# Altium PCB MergenSMPSBoardDesign.PcbDoc (part 2 of 3)
Units mm, origin at the board's own origin, x right, y up, seen from the top; angles counter-clockwise.
Board outline 115 x 90 mm, 4 copper layers (Top Layer, Layer 2, Layer 3, Bottom Layer), stack 1.527 mm thick; 83 components, 46 nets, 675 pads, 1118 vias.
Unrouted connection lines stored in the file: 1.
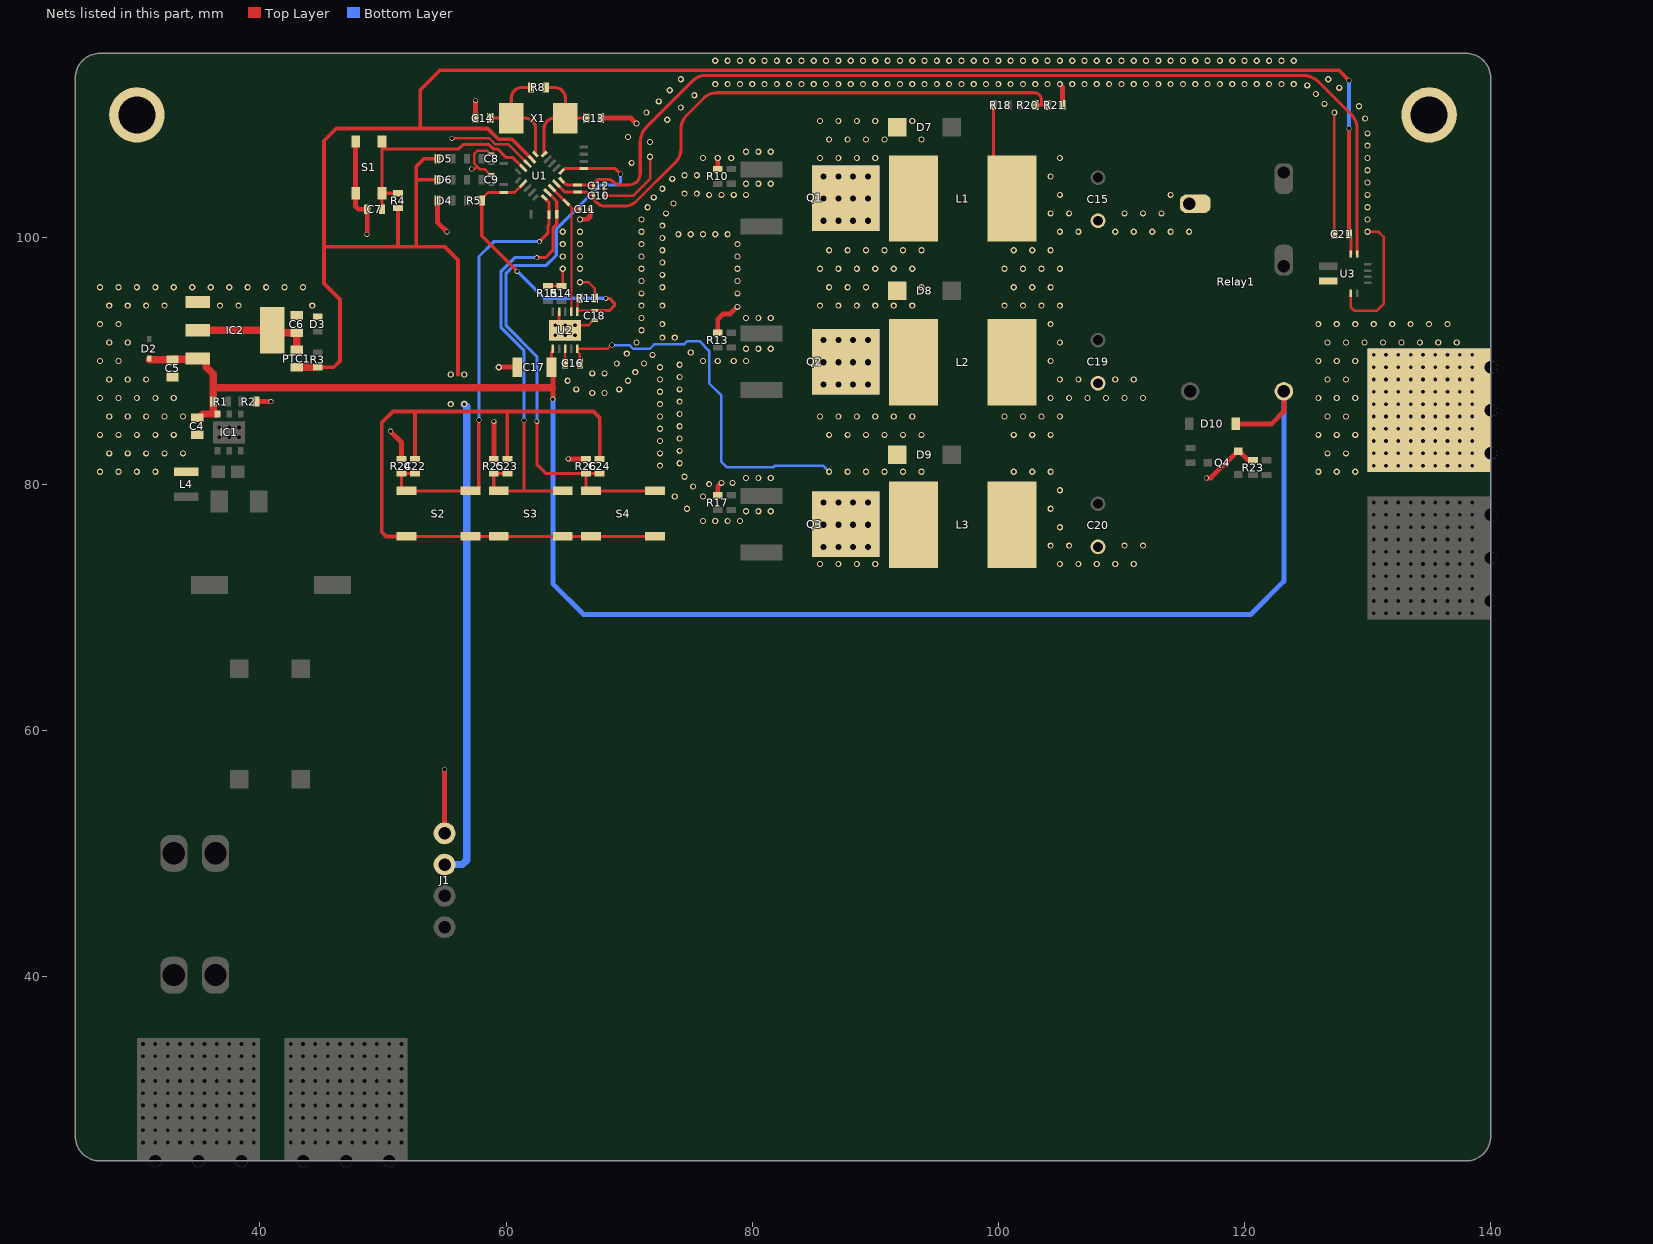
[diagram p4: the nets of this part, all layers, seen from the top]

## Part data
C1: library part MergenElektronik_Capacitors_AluminumElectrolytics_SMDs_UUX1J101MNL1GS, "Mergen Elektronik - Capacitors - Aluminum Electrolytics - SMDs - UUX1J101MNL1GS", Manufacturer=Nichicon, Manufacturer Number=UUX1J101MNL1GS, Package=10x10.5mm, Supplier Part Number 1=493-7453-1-ND, Temperature="-55°C up to +105°C", Tolerance=±20%, Voltage Rated=63V, Digi-Key Number=493-7453-1-ND, Farnell Number=2841944, Model="Aluminum Electrolytic Capacitors", Mounting Type="Surface Mount", Mouser Number=647-UUX1J101MNL1GS, Supplier 1=Digikey, Supplier 2=Mouser, Supplier Part Number 2=647-UUX1J101MNL1GS
C2: library part MergenElektronik_Capacitors_Ceramic_SMDs_0.33µF_100V, "Mergen Elektronik - Capacitors - Ceramics - SMDs - 1206 - 0.33 µF - 100V", Manufacturer="TDK Corporation", Manufacturer Number=C3216X7R2A334K130AA, Package="1206(3216 Metric)", Supplier Part Number 1=445-4464-6-ND, Temperature="-55°C up to +125°C", Tolerance=±10%, Voltage Rated=100V, Digi-Key Number=445-4464-1-ND, Farnell Number=2525186, Model="Ceramic Capacitors", Mounting Type="Surface Mount", Mouser Number=810-C3216X7R2A334K, Supplier 1=Digikey, Supplier 2=Mouser, Supplier Part Number 2=810-C3216X7R2A334K
C3: library part MergenElektronik_Capacitors_Ceramic_SMDs_10nF_100V, "Mergen Elektronik - Capacitors - Ceramics - SMDs - 0603 - 10 nF - 100V", Manufacturer="Murata Electronics", Manufacturer Number=GCM188R72A103KA37D, Package="0603(1608 Metric)", Supplier Part Number 1=490-4781-1-ND, Temperature="-55°C up to +125°C", Tolerance=±10%, Voltage Rated=100V, Digi-Key Number=490-4781-1-ND, Farnell Number=2470432, Model="Ceramic Capacitors", Mounting Type="Surface Mount", Mouser Number=81-GCM188R72A103KA7D, Supplier 1=Digikey, Supplier 2=Mouser, Supplier Part Number 2=81-GCM188R72A103KA7D, Özdisan Number=GCM188R72A103KA37D
C4 C5 C6 C7 C21 C22 C23 C24: library part MergenElektronik_Capacitors_Ceramic_SMDs_100nF_16V, "Mergen Elektronik - Capacitors - Ceramics - SMDs - 0603 - 100 nF - 16V", Manufacturer="Samsung Electro-Mechanics", Manufacturer Number=CL10B104KO8NNNC, Package=0603(1608), Supplier Part Number 1=187-CL10B104KO8NNNC, Temperature="-55°C up to +125°C", Tolerance=±10%, Voltage Rated=16V, Digi-Key Number=1276-1005-1-ND, Farnell Number=3013413, Model="Ceramic Capacitors", Mounting Type="Surface Mount", Mouser Number=187-CL10B104KO8NNNC, Supplier 1=Mouser, Supplier 2=Digi-Key, Supplier Part Number 2=1276-1005-6-ND, Özdisan Number=CL10B104KO8NNNC
C8 C9 C10 C11 C12: library part MergenElektronik_Capacitors_Ceramic_SMDs_50pF_50V, "Mergen Elektronik - Capacitors - Ceramics - SMDs - 0402 - 50 pF - 50V", Manufacturer=YAGEO, Manufacturer Number=CC0402JRNPO9BN500, Package=0603(1608), Supplier Part Number 1=13-CC0402JRNPO9BN500TR-ND, Temperature="-55°C up to +125°C", Tolerance=±5%, Voltage Rated=50V, Digi-Key Number=13-CC0402JRNPO9BN500TR-ND, Model="Ceramic Capacitors", Mounting Type="Surface Mount", Mouser Number=603-CC0402JNPO9BN500, Supplier 1=Digi-Key, Supplier 2=Mouser, Supplier Part Number 2=603-CC0402JNPO9BN500, Özdisan Number=CC0402JRNPO9BN500
C13 C14: library part MergenElektronik_Capacitors_Ceramic_SMDs_8pF_50V, "Mergen Elektronik - Capacitors - Ceramics - SMDs - 0603 - 8 pF - 50V", Manufacturer=YAGEO, Manufacturer Number=CC0603DRNPO9BN8R0, Package=0603(1608), Supplier Part Number 1=311-1057-6-ND, Temperature="-55°C up to +125°C", Tolerance=±0.5pF, Voltage Rated=50V, Digi-Key Number=311-1057-1-ND, Farnell Number=3764404RL, Model="Ceramic Capacitors", Mounting Type="Surface Mount", Mouser Number=603-CC603DRNPO9BN8R0, Supplier 1=Digikey, Supplier 2=Mouser, Supplier Part Number 2=603-CC603DRNPO9BN8R0, Özdisan Number=CC0603DRNPO9BN8R0
C15 C19 C20: library part MergenElektronik_Capacitors_AluminumElectrolytics_THTs_63SXE18M, "Mergen Elektronik- Capacitors - Aluminum Electrolytics - THTs - 63SXE18M", Manufacturer="Panasonic Electronic Components", Manufacturer Number=100SXE6R8M, Package=8x7mm, Supplier Part Number 1=P122614-ND, Temperature="-55°C up to +125°C", Tolerance=±20%, Voltage Rated=63V, Digi-Key Number=P122614-ND, Farnell Number=2920530, Model="Aluminum Electrolytic Capacitors", Mounting Type="Through Hole", Mouser Number=667-63SXE18M, Supplier 1=Digikey, Supplier 2=Mouser, Supplier Part Number 2=667-63SXE18M, Özdisan Number=63SXE18M
C16: library part MergenElektronik_Capacitors_Ceramic_SMDs_100nF_100V, "Mergen Elektronik - Capacitors - Ceramics - SMDs - 0603 - 100 nF - 100V", Manufacturer="Samsung Electro-Mechanics", Manufacturer Number=CL10B104KC8NNNC, Package="0603(1608 Metric)", Supplier Part Number 1=1276-6807-1-ND, Temperature="-55°C up to +125°C", Tolerance=±10%, Voltage Rated=100V, Digi-Key Number=1276-6807-1-ND, Farnell Number=3013412, Model="Ceramic Capacitors", Mounting Type="Surface Mount", Mouser Number=187-CL10B104KC8NNNC, Supplier 1=Digikey, Supplier 2=Mouser, Supplier Part Number 2=187-CL10B104KC8NNNC, Özdisan Number=CL10B104KC8NNNC
C17: library part MergenElektronik_Capacitors_Ceramic_SMDs_1µF_100V, "Mergen Elektronik - Capacitors - Ceramics - SMDs - 1206 - 1 µF - 100V", Manufacturer="Samsung Electro-Mechanics", Manufacturer Number=CL31B105KCHNNNE, Package="1206(3216 Metric)", Supplier Part Number 1=1276-1838-1-ND, Temperature="-55°C up to +125°C", Tolerance=±10%, Voltage Rated=100V, Digi-Key Number=1276-1838-1-ND, Model="Ceramic Capacitors", Mounting Type="Surface Mount", Mouser Number=187-CL31B105KCHNNNE, Supplier 1=Digikey, Supplier 2=Mouser, Supplier Part Number 2=187-CL31B105KCHNNNE, Özdisan Number=CL31B105KCHNNNE
C18: library part MergenElektronik_Capacitors_Ceramic_SMDs_1nF_50V, "Mergen Elektronik - Capacitors - Ceramics - SMDs - 0402 - 1 nF - 50V", Manufacturer="Murata Electronics", Manufacturer Number=GRM1555C1H102JA01D, Package="0402(1005 Metric)", Supplier Part Number 1=490-3244-1-ND, Temperature="-55°C up to +125°C", Tolerance=±5%, Voltage Rated=50V, Digi-Key Number=490-3244-1-ND, Farnell Number=8819556, Model="Ceramic Capacitors", Mounting Type="Surface Mount", Mouser Number=81-GRM1555C1H102JA1D, Supplier 1=Digikey, Supplier 2=Mouser, Supplier Part Number 2=81-GRM1555C1H102JA1D, Özdisan Number=GRM1555C1H102JA01D
D1: library part MergenElektronik_Diodes_BridgeRectifiers_TBS606, "Mergen Elektronik - Diodes - Bridge Rectifiers - TBS606", Current Rating=6A, Manufacturer="Taiwan Semiconductor Corporation", Supplier Part Number 1=1801-TBS606CT-ND, Temperature="-55°C up to 150°C (TJ)", Voltage Rated=600V, Digi-Key Number=1801-TBS606TR-ND, Manufacturer Number=TBS606, Model="Bridge Rectifier", Mounting Type="Surface Mount", Mouser Number=821-TBS606, Package=TBS606, Supplier 1=Digikey, Supplier 2=Mouser, Supplier Part Number 2=821-TBS606
D2: library part MergenElektronik_Diodes_SchottkyDiodes_BAT54XV2T1G, "Mergen Elektronik - Diodes - Schottky Diodes - BAT54XV2T1G", Current Rating=200mA, Manufacturer=onsemi, Package=SOD-523, Supplier Part Number 1=BAT54XV2T1GOSCT-ND, Temperature="-55°C up to +150°C", Voltage Rated=100V, Digi-Key Number=BAT54XV2T1GOSCT-ND, Farnell Number=1459034, Manufacturer Number=BAT54XV2T1G, Model="Schottky Diodes", Mounting Type="Surface Mount", Mouser Number=863-BAT54XV2T1G, Supplier 1=Digikey, Supplier 2=Mouser, Supplier Part Number 2=863-SBAT54XV2T1G
D3 D4: library part MergenElektronik_LEDs_SMDs_Red_0603, "Mergen Elektronik - Leds - SMDs - Red - 0603", Manufacturer="Würth Elektronik", Manufacturer Number=150060RS75000, Package=0603(1608), Supplier Part Number 1=732-4978-1-ND, Temperature="-45°C up to +85°C", Voltage Rated=2V, Color=Red, Digi-Key Number=732-4978-1-ND, Farnell Number=2322071, Model="SMD Leds", Mounting Type="Surface Mount", Mouser Number=710-150060RS75000, Supplier 1=Digi-Key, Supplier 2=Mouser, Supplier Part Number 2=710-150060RS75000, Özdisan Number=150060RS75000
D5 D6: library part MergenElektronik_LEDs_SMDs_Green_0603, "Mergen Elektronik - Leds - SMDs - Green - 0603", Manufacturer="Würth Elektronik", Manufacturer Number=150060GS75000, Package=0603(1608), Supplier Part Number 1=732-4971-6-ND, Temperature="-45°C up to +85°C", Voltage Rated=3.2V, Color=Green, Digi-Key Number=732-4971-1-ND, Farnell Number=2322070, Model="SMD Leds", Mounting Type="Surface Mount", Mouser Number=710-150060GS75000, Supplier 1=Digi-Key, Supplier 2=Mouser, Supplier Part Number 2=710-150060GS75000, Özdisan Number=150060GS75000
D7 D8 D9: library part MergenElektronik_Diodes_SchottkyDiodes_SL310A-TP, "Mergen Elektronik - Diodes - Schottky Diodes - SL310A-TP", Current Rating=3A, Manufacturer="Micro Commercial Co", Package=DO-214AC(SMA), Supplier Part Number 1=SL310A-TPMSDKR-ND, Temperature="-55°C up to +150°C", Voltage Rated=100V, Digi-Key Number=SL310A-TPMSTR-ND, Manufacturer Number=SL310A-TP, Model="Schottky Diodes", Mounting Type="Surface Mount", Mouser Number=833-SL310A-TP, Supplier 1=Digikey, Supplier 2=Mouser, Supplier Part Number 2=833-SL310A-TP
D10: library part MergenElektronik_Diodes_SingleDiodes_1N4007FL, "Mergen Elektronik - Diodes - Single Diodes - 1N4007FL", Current Rating=1A, Manufacturer="SMC Diode Solutions", Package=SOD-123F, Supplier Part Number 1=1655-1N4007FLCT-ND, Temperature="-65°C up to +150°C", Voltage Rated=1000V, Digi-Key Number=1655-1N4007FLCT-ND, Manufacturer Number=1N4007FL, Model="Single Diodes", Mounting Type="Surface Mount", Supplier 1=Digi-Key
F1: library part MergenElektronik_FuseHolders_BladeType_3568, "Mergen Elektronik - Fuse Holder - Blade Type - 3568", Current Rating=30A, Manufacturer="Keystone Electronics", Supplier Part Number 1=36-3568-ND, Temperature="-50°C up to+145°C", Voltage Rated=500V, Digi-Key Number=36-3568-ND, Farnell Number=2504685, Manufacturer Number=3568, Model="Blade Type", Mounting Type=THT, Mouser Number=534-3568, Package=3568, Supplier 1=Digi-Key, Supplier 2=Mouser, Supplier Part Number 2=534-3568
IC1: library part MergenElektronik_Regulators_Linears_MAX5084ATT+T, "Mergen Elektronik - Regulators - Linears - MAX5084ATT+T", Current Rating=200mA, Manufacturer="Analog Devices Inc./Maxim Integrated", Output Voltage="2.54V up to 11V", Package=6-TDFN, Supplier Part Number 1=MAX5084ATT+CT-ND, Temperature="-40°C up to +125°C", Voltage Rated="4V up to 65V", Digi-Key Number=MAX5084ATT+TR-ND, Farnell Number=2514348, Manufacturer Number=MAX5084ATT+T, Model=Linear, Mounting Type="Surface Mount", Mouser Number=700-MAX5084ATTT, Supplier 1=Digikey, Supplier 2=Mouser, Supplier Part Number 2=700-MAX5084ATTT
IC2: library part MergenElektronik_Regulators_Linears_NCP1117ST33T3G, "Mergen Elektronik - Regulators - Linears - NCP1117ST33T3G", Current Rating=1A, Manufacturer=onsemi, Manufacturer Number=NCP1117ST33T3G, Output Voltage=3.3V, Package=SOT-223, Supplier Part Number 1=NCP1117ST33T3GOSCT-ND, Temperature="0°C up to +125°C", Voltage Rated="4.75VDC up to 10V", Digi-Key Number=NCP1117ST33T3GOSCT-ND, Model=Linear, Mounting Type="Surface Mount", Mouser Number=863-NCP1117ST33T3G, Supplier 1=Digi-Key, Supplier 2=Mouser, Supplier Part Number 2=863-NCP1117ST33T3G, Özdisan Number=NCP1117ST33T3G
J1: library part MergenElektronik_Connectors_Headers_1x4_Male, "Mergen Elektronik - Connectors - Headers - 1x4 Male"
L1 L2 L3: library part MergenElektronik_Inductors_PowerInductors_SMDs_ASPI-8040S-750M-T, "Mergen Elektronik - Inductors - Power Inductors - SMDs - 8x8mm  75-µh - 1.2A", Current Rating=1.2A, Manufacturer="Abracon LLC", Manufacturer Number=ASPI-8040S-750M-T, Package="8x8x4mm Shielded", Supplier Part Number 1=535-13053-1-ND, Temperature="-40°C up to  125°C", Digi-Key Number=535-13053-1-ND, Model="Power Inductor", Mounting Type="Surface Mount", Mouser Number=815-ASPI-8040S-750MT, Supplier 1=Digikey, Supplier 2=Mouser, Supplier Part Number 2=815-ASPI-8040S-750MT
L4: library part MergenElektronik_Inductors_PowerInductors_SMDs_1008_2.2µH-2A, "Mergen Elektronik - Inductors - Power Inductors - SMDs - 1008 - 2.2 µh - 2A", Current Rating=2A, Manufacturer="Samsung Electro-Mechanics", Manufacturer Number=CIGT252008LM2R2MNE, Package="1008 (2520 Metric)", Supplier Part Number 1=1276-6925-6-ND, Temperature="-40°C up to  125°C", Digi-Key Number=1276-6925-1-ND, Model="Power Inductor", Mounting Type="Surface Mount", Mouser Number=187-CIGT252008LM2R2M, Supplier 1=Digi-Key, Supplier 2=Mouser, Supplier Part Number 2=187-CIGT252008LM2R2M
PTC1: library part MergenElektronik_CircuitProtections_PTCs_0ZCK0020FF2G, "Mergen Elektronik - Circuit Protections - PTCs - 0ZCK0020FF2G", Current - Hold="200 mA", Current - Max=100A, Current - Trip="500 mA", Manufacturer="Bel Fuse Inc.", Package=0805(2012), Supplier Part Number 1=507-1811-6-ND, Temperature="-40°C up to 85°C", Voltage Rated=9V, Current Rating="500 mA", Digi-Key Number=507-1811-1-ND, Manufacturer Number=0ZCK0020FF2G, Model="PTC Fuse", Mounting Type="Surface Mount", Mouser Number=530-0ZCK0020FF2G, Supplier 1=Digi-Key, Supplier 2=Mouser, Supplier Part Number 2=530-0ZCK0020FF2G
Q1 Q2 Q3: library part MergenElektronik_Transistors_Mosfets_DMN10H220LK3-13, "Mergen Elektronik - Transistors - Mosfets - DMN10H220LK3-13", Current Rating=7.5A, Manufacturer="Diodes Incorporated", Package="TO-252-3 DPAK", Supplier Part Number 1=31-DMN10H220LK3-13CT-ND, Temperature="-55°C up to +175°C (TJ)", Voltage Rated=100V, Digi-Key Number=31-DMN10H220LK3-13CT-ND, Farnell Number=3943521RL, Manufacturer Number=DMN10H220LK3-13, Model=Mosfet, Mounting Type="Surface Mount", Mouser Number=621-DMN10H220LK3-13, Rating Current=7.5A, Supplier 1=Digikey, Supplier 2=Mouser, Supplier Part Number 2=621-DMN10H220LK3-13, Vdss=100V, Id=7.5A
Q4: library part MergenElektronik_Transistors_Mosfets_BSS138LT1G, "Mergen Elektronik - Transistors - Mosfets - BSS138LT1G", Current Rating=200mA, Manufacturer=onsemi, Package=SOT-23, Supplier Part Number 1=BSS138LT1GOSCT-ND, Temperature="-55°C up to +175°C (TJ)", Voltage Rated=50V, Digi-Key Number=BSS138LT1GOSCT-ND, Farnell Number=1431319, Manufacturer Number=BSS138LT1G, Model=Mosfet, Mounting Type="Surface Mount", Mouser Number=863-BSS138LT1G, Rating Current=200mA, Supplier 1=Digi-Key, Supplier 2=Mouser, Supplier Part Number 2=863-BSS138LT1G, Vdss=50V, Özdisan Number=BSS138LT1G, Id=200mA
R1 R11 R14 R15 R23 R24 R25 R26: library part MergenElektronik_Resistors_ChipResistors_0603_10K, "Mergen Elektronik - Resistors - Chip Resistors - 0603 - 10K", Manufacturer="Stackpole Electronics Inc", Manufacturer Number=RMCF0603JT10K0, Package=0603(1608), Power=1/10W, Supplier Part Number 1=RMCF0603JT10K0-ND, Temperature="-55°C up to +155°C - X8R", Tolerance=±5%, Digi-Key Number=RMCF0603JT10K0CT-ND, Model="Chip Resistor", Mounting Type="Surface Mount", Supplier 1=Digi-Key
R2: library part MergenElektronik_Resistors_ChipResistors_0603_2K, "Mergen Elektronik - Resistors - Chip Resistors - 0603 - 2K", Manufacturer="Panasonic Electronic Components", Manufacturer Number=ERJ-3EKF2001V, Package=0603(1608), Power=1/10W, Supplier Part Number 1=P2.00KHDKR-ND, Temperature="-55°C up to +155°C - X8R", Tolerance=±1%, Digi-Key Number=P2.00KHCT-ND, Farnell Number=2059343, Model="Chip Resistor", Mounting Type="Surface Mount", Mouser Number=667-ERJ-3EKF2001V, Supplier 1=Digikey, Supplier 2=Mouser, Supplier Part Number 2=667-ERJ-3EKF2001V, Özdisan Number=ERJ-3EKF2001V
R3 R5 R6 R7 R9 R12 R16 R22: library part MergenElektronik_Resistors_ChipResistors_0603_330R, "Mergen Elektronik - Resistors - Chip Resistors - 0603 - 330R", Manufacturer="Stackpole Electronics Inc", Manufacturer Number=RMCF0603JT330R, Package=0603(1608), Power=1/10W, Supplier Part Number 1=RMCF0603JT330RCT-ND, Temperature="-55°C up to +155°C - X8R", Tolerance=±5%, Digi-Key Number=RMCF0603JT330RCT-ND, Model="Chip Resistor", Mounting Type="Surface Mount", Supplier 1=Digi-Key
R4 R18: library part MergenElektronik_Resistors_ChipResistors_0603_40K, "Mergen Elektronik - Resistors - Chip Resistors - 0603 - 40K", Manufacturer=YAGEO, Manufacturer Number=RT0603BRD0740KL, Package=0603(1608), Power=1/10W, Supplier Part Number 1=13-RT0603BRD0740KLDKR-ND, Temperature="-55°C up to +155°C - X8R", Tolerance=±0.1%, Digi-Key Number=13-RT0603BRD0740KLTR-ND, Model="Chip Resistor", Mounting Type="Surface Mount", Mouser Number=603-RT0603BRD0740KL, Supplier 1=Digikey, Supplier 2=Mouser, Supplier Part Number 2=603-RT0603BRD0740KL
R8: library part MergenElektronik_Resistors_ChipResistors_0603_200K, "Mergen Elektronik - Resistors - Chip Resistors - 0603 - 200K", Manufacturer="Stackpole Electronics Inc", Manufacturer Number=RMCF0603FT200K, Package=0603(1608), Power=1/10W, Supplier Part Number 1=RMCF0603FT200KTR-ND, Temperature="-55°C up to +155°C - X8R", Tolerance=±1%, Digi-Key Number=RMCF0603FT200KTR-ND, Model="Chip Resistor", Mounting Type="Surface Mount", Mouser Number=708-RMCF0603FT200K, Supplier 1=Digikey, Supplier 2=Mouser, Supplier Part Number 2=708-RMCF0603FT200K
R10 R13 R17: library part MergenElektronik_Resistors_ChipResistors_0603_1K, "Mergen Elektronik - Resistors - Chip Resistors - 0603 - 1K", Manufacturer="Stackpole Electronics Inc", Manufacturer Number=RMCF0603JT1K00, Package=0603(1608), Power=1/10W, Supplier Part Number 1=RMCF0603JT1K00DKR-ND, Temperature="-55°C up to +155°C - X8R", Tolerance=±5%, Digi-Key Number=RMCF0603JT1K00CT-ND, Model="Chip Resistor", Mounting Type="Surface Mount", Mouser Number=708-RMCF0603JT1K00, Supplier 1=Digikey, Supplier 2=Mouser, Supplier Part Number 2=708-RMCF0603JT1K00
R19: library part MergenElektronik_Resistors_ChipResistors_0603_22, "Mergen Elektronik - Resistors - Chip Resistors - 0603 - 22", Manufacturer="TE Connectivity Passive Product", Manufacturer Number=CRGCQ0603J22R, Package=0603(1608), Power=1/10W, Supplier Part Number 1=A130081CT-ND, Temperature="-55°C up to +155°C - X8R", Tolerance=±5%, Digi-Key Number=A130081CT-ND, Farnell Number=2861854, Model="Chip Resistor", Mounting Type="Surface Mount", Mouser Number=279-CRGCQ0603J22R, Supplier 1=Digi-Key, Supplier 2=Mouser, Supplier Part Number 2=279-CRGCQ0603J22R, Özdisan Number=RMCF0603ZT0R00
R20: library part MergenElektronik_Resistors_ChipResistors_0603_6.65K, "Mergen Elektronik - Resistors - Chip Resistors - 0603 - 6.65K", Manufacturer=YAGEO, Manufacturer Number=RC0603FR-076K65L, Package=0603(1608), Power=1/10W, Supplier Part Number 1=311-6.65KHRCT-ND, Temperature="-55°C up to +155°C - X8R", Tolerance=±1%, Digi-Key Number=311-6.65KHRCT-ND, Farnell Number=3950957, Model="Chip Resistor", Mounting Type="Surface Mount", Mouser Number=603-RC0603FR-076K65L, Supplier 1=Digikey, Supplier 2=Mouser, Supplier Part Number 2=603-RC0603FR-076K65L, Özdisan Number=RC0603FR-076K65L
R21: library part MergenElektronik_Resistors_ChipResistors_0603_3.3K, "Mergen Elektronik - Resistors - Chip Resistors - 0603 - 3.3K", Manufacturer=YAGEO, Manufacturer Number=RC0603FR-073K3L, Package=0603(1608), Power=1/10W, Supplier Part Number 1=311-3.30KHRCT-ND, Temperature="-55°C up to +155°C - X8R", Tolerance=±1%, Digi-Key Number=311-3.30KHRTR-ND, Farnell Number=9238549, Model="Chip Resistor", Mounting Type="Surface Mount", Mouser Number=603-RC0603FR-073K3L, Supplier 1=Digikey, Supplier 2=Mouser, Supplier Part Number 2=RC0603FR-073K3L, Özdisan Number=RC0603FR-073K3L
Relay1: library part MergenElektronik_Relays_PowerRelays_ALQ105, "Mergen Elektronik - Relays - Power Relays - ALQ105", Current Rating=5A, Manufacturer="Panasonic Electric Works", Supplier Part Number 1=255-3565-ND, Switching Voltage="250VAC, 30VDC - Max", Temperature="-40°C up to 85°C", Digi-Key Number=255-3565-ND, Farnell Number=2503675, Manufacturer Number=ALQ105, Model="Power Relays", Mounting Type=THT, Mouser Number=769-ALQ105, Package=ALQ105, Supplier 1=Digi-Key, Supplier 2=Mouser, Supplier Part Number 2=769-ALQ105
S1: library part MergenElektronik_Switches_TactileSwitches_PTS815-SJM, "Mergen Elektronik - Switches - Tactile  Switches", Current Rating=50mA, Manufacturer=C&K, Manufacturer Number="PTS815 SJM 250 SMTR LFS", Package=PTS815, Supplier Part Number 1=611-PTS815SJM250SMTR, Temperature="-20°C up to +70°C", Voltage Rated=12VDC, Digi-Key Number=CKN12215-1-ND, Farnell Number=3780619, Model="Tactile Switches", Mounting Type="Surface Mount", Mouser Number=611-PTS815SJM250SMTR, Supplier 1=Mouser, Supplier 2=Digi-Key, Supplier Part Number 2=CKN12215-6-ND
S2 S3 S4: library part "MergenElektronik_Switches_TactileSwitches_PTS526 SK15 SMTR2 LFS", "Mergen Elektronik - Switches - Tactile  Switches - PTS526 SK15 SMTR2 LFS", Current Rating=50mA, Manufacturer=C&K, Package=PTS526, Supplier Part Number 1=CKN12221-2-ND, Temperature="-20°C up to +70°C", Voltage Rated=12VDC, Digi-Key Number=CKN12221-2-ND, Farnell Number=3780596, Manufacturer Number="PTS526 SK15 SMTR2 LFS", Model="Tactile Switches", Mounting Type="Surface Mount", Mouser Number=611-PTS526SK15SMR2L, Supplier 1=Digi-Key, Supplier 2=Mouser, Supplier Part Number 2=611-PTS526SK15SMR2L
U1: library part MergenElektronik_Microcontrollers_STMicroelectronics_STM32C011F6U6TR, "Mergen Elektronik - Microcontrollers - STMicroelectronics - STM32C011F6U6TR", Manufacturer=STMicroelectronics, Operating Supply Voltage="2V up to 3.6V", Package=UFQFPN-20, Supplier Part Number 1=497-STM32C011F6U6TRCT-ND, Temperature="-40°C up to 85°C (TA)", Core Size=32-Bit, Digi-Key Number=497-STM32C011F6U6TR-ND, Farnell Number=4138292RL, Manufacturer Number=STM32C011F6U6TR, Memory Size=32kB, Model="ARM® Cortex®-M0+ Microcontroller", Mounting Type="Surface Mount", Mouser Number=511-STM32C011F6U6TR, Number of I/O=18, Ram Size="6K x 8", Speed=48MHz, Supplier 1=Digikey, Supplier 2=Mouser, Supplier Part Number 2=511-STM32C011F6U6TR
U2: library part MergenElektronik_Logics_GateDrivers_UCC27282DRCT, "Mergen Elektronik - Logics - Gate Drivers - UCC27282DRCT", Current Rating=3A, Manufacturer="Texas Instruments", Operating Supply Voltage="5.5V up to 16VDC", Package="10-VSON 3x3", Supplier Part Number 1=296-53422-1-ND, Temperature="-40°C up to 125°C", Voltage Rated=120VDC, Channel Type=İndependent, Digi-Key Number=296-53422-1-ND, Gate Driver Type="Half Bridge", Gaye Type="N-Channel MOSFET", Manufacturer Number=UCC27282DRCT, Model="Gate Driver", Mounting Type="Surface Mount", Mouser Number=595-UCC27282DRCT, Supplier 1=Digikey, Supplier 2=Mouser, Supplier Part Number 2=595-UCC27282DRCT
U3: library part MergenElektronik_Sensors_CurrentSensors_ACS711KEXLT-31AB-T, "Mergen Elektronik - Sensors - Current Sensors - ACS711KEXLT-31AB-T", Current Rating=31A, Manufacturer="Allegro MicroSystems", Operating Supply  Voltage="3V up to 5.5V", Supplier Part Number 1=620-1482-1-ND, Temperature="-40°C up to +125°C", Accuracy=±5%, Digi-Key Number=620-1482-1-ND, Farnell Number=3594556, Manufacturer Number=ACS711KEXLT-31AB-T, Measuring=AC/DC, Model="Current Sensor", Mounting Type="Surface Mount", Mouser Number=250-711KEXLT31ABT, Number of Channel=1, Package=ACS711KEXLT-31AB-T, Sensor Type="Hall Effect", Supplier 1=Digi-Key, Supplier 2=Mouser, Supplier Part Number 2=250-711KEXLT31ABT, Özdisan Number=ACS711KEXLT-31AB-T
U4: library part MergenElektronik_Screens_LCDs_16x2Module, "Mergen Elektronik - Screens - LCDs - 16x2 Module"
X1: library part MergenElektronik_Oscillators_Crystals_2_SMD_48MHz, "Mergen Elektronik - Oscilators - Crystals - 2-SMD - 48 MHz", Load Capacitance="8 pF", Manufacturer="NDK America, Inc.", Manufacturer Number=LNCD1-48M, Package=2-SMD, Supplier Part Number 1=644-LNCD1-48MTR-ND, Temperature="-40°C up to 85°C", Digi-Key Number=644-LNCD1-48MTR-ND, Frequency="48 MHz", Model="Crystal Oscilator", Mounting Type="Surface Mount", Supplier 1=Digi-Key

## Free pads (board coordinates)
  round 4.5 hole 3: 7(30,110) 8(135,110)
  rect 10x10 smd: 9(35,30) 9(135,74) 10(47.008,30.001) 10(135,86)
  rect 10x10 smd far side: 9(35,30) 9(135,74) 10(47,30) 10(135,86)
  rect 0.7x0.25 smd: 11(65.8,104.3) ""(59.8,103.7) ""(59.818,104.336) ""(59.818,106.036) ""(65.818,103.736) ""(66.3,106.2) ""(66.3,106.8) ""(66.3,107.4) ""(66.318,105.636)
  round 0.5 hole 0.3: 12(30.5,26.5) 12(30.5,28.5) 12(30.5,30.5) 12(30.5,32.5) 12(30.5,34.5) 12(31.5,26.5) 12(31.5,28.5) 12(31.5,30.5) 12(31.5,32.5) 12(31.5,34.5) 12(32.5,26.5) 12(32.5,28.5) 12(32.5,30.5) 12(32.5,32.5) 12(32.5,34.5) 12(33.5,26.5) 12(33.5,28.5) 12(33.5,30.5) 12(33.5,32.5) 12(33.5,34.5) 12(34.5,26.5) 12(34.5,28.5) 12(34.5,30.5) 12(34.5,32.5) 12(34.5,34.5) 12(35.5,26.5) 12(35.5,28.5) 12(35.5,30.5) 12(35.5,32.5) 12(35.5,34.5) 12(36.5,26.5) 12(36.5,28.5) 12(36.5,30.5) 12(36.5,32.5) 12(36.5,34.5) 12(37.5,26.5) 12(37.5,28.5) 12(37.5,30.5) 12(37.5,32.5) 12(37.5,34.5) 12(38.5,26.5) 12(38.5,28.5) 12(38.5,30.5) 12(38.5,32.5) 12(38.5,34.5) 12(39.5,26.5) 12(39.5,28.5) 12(39.5,30.5) 12(39.5,32.5) 12(39.5,34.5) 12(42.5,26.5) 12(42.5,28.5) 12(42.5,30.5) 12(42.5,32.5) 12(42.5,34.5) 12(43.5,26.5) 12(43.5,28.5) 12(43.5,30.5) 12(43.5,32.5) 12(43.5,34.5) 12(44.5,26.5) 12(44.5,28.5) 12(44.5,30.5) 12(44.5,32.5) 12(44.5,34.5) 12(45.5,26.5) 12(45.5,28.5) 12(45.5,30.5) 12(45.5,32.5) 12(45.5,34.5) 12(46.5,26.5) 12(46.5,28.5) 12(46.5,30.5) 12(46.5,32.5) 12(46.5,34.5) 12(47.5,26.5) 12(47.5,28.5) 12(47.5,30.5) 12(47.5,32.5) 12(47.5,34.5) 12(48.5,26.5) 12(48.5,28.5) 12(48.5,30.5) 12(48.5,32.5) 12(48.5,34.5) 12(49.5,26.5) 12(49.5,28.5) 12(49.5,30.5) 12(49.5,32.5) 12(49.5,34.5) 12(50.5,26.5) 12(50.5,28.5) 12(50.5,30.5) 12(50.5,32.5) 12(50.5,34.5) 12(51.5,26.5) 12(51.5,28.5) 12(51.5,30.5) 12(51.5,32.5) 12(51.5,34.5) 12(130.5,69.5) 12(130.5,70.5) 12(130.5,71.5) 12(130.5,72.5) 12(130.5,73.5) 12(130.5,74.5) 12(130.5,75.5) 12(130.5,76.5) 12(130.5,77.5) 12(130.5,78.5) 12(130.5,81.5) 12(130.5,82.5) 12(130.5,83.5) 12(130.5,84.5) 12(130.5,85.5) 12(130.5,86.5) 12(130.5,87.5) 12(130.5,88.5) 12(130.5,89.5) 12(130.5,90.5) 12(132.5,69.5) 12(132.5,70.5) 12(132.5,71.5) 12(132.5,72.5) 12(132.5,73.5) 12(132.5,74.5) 12(132.5,75.5) 12(132.5,76.5) 12(132.5,77.5) 12(132.5,78.5) 12(132.5,81.5) 12(132.5,82.5) 12(132.5,83.5) 12(132.5,84.5) 12(132.5,85.5) 12(132.5,86.5) 12(132.5,87.5) 12(132.5,88.5) 12(132.5,89.5) 12(132.5,90.5) 12(134.5,69.5) 12(134.5,70.5) 12(134.5,71.5) 12(134.5,72.5) 12(134.5,73.5) 12(134.5,74.5) 12(134.5,75.5) 12(134.5,76.5) 12(134.5,77.5) 12(134.5,78.5) 12(134.5,81.5) 12(134.5,82.5) 12(134.5,83.5) 12(134.5,84.5) 12(134.5,85.5) 12(134.5,86.5) 12(134.5,87.5) 12(134.5,88.5) 12(134.5,89.5) 12(134.5,90.5) 12(136.5,69.5) 12(136.5,70.5) 12(136.5,71.5) 12(136.5,72.5) 12(136.5,73.5) 12(136.5,74.5) 12(136.5,75.5) 12(136.5,76.5) 12(136.5,77.5) 12(136.5,78.5) 12(136.5,81.5) 12(136.5,82.5) 12(136.5,83.5) 12(136.5,84.5) 12(136.5,85.5) 12(136.5,86.5) 12(136.5,87.5) 12(136.5,88.5) 12(136.5,89.5) 12(136.5,90.5) 12(138.5,69.5) 12(138.5,70.5) 12(138.5,71.5) 12(138.5,72.5) 12(138.5,73.5) 12(138.5,74.5) 12(138.5,75.5) 12(138.5,76.5) 12(138.5,77.5) 12(138.5,78.5) 12(138.5,81.5) 12(138.5,82.5) 12(138.5,83.5) 12(138.5,84.5) 12(138.5,85.5) 12(138.5,86.5) 12(138.5,87.5) 12(138.5,88.5) 12(138.5,89.5) 12(138.5,90.5) 13(30.5,27.5) 13(30.5,29.5) 13(30.5,31.5) 13(30.5,33.5) 13(31.5,27.5) 13(31.5,29.5) 13(31.5,31.5) 13(31.5,33.5) 13(32.5,27.5) 13(32.5,29.5) 13(32.5,31.5) 13(32.5,33.5) 13(33.5,27.5) 13(33.5,29.5) 13(33.5,31.5) 13(33.5,33.5) 13(34.5,27.5) 13(34.5,29.5) 13(34.5,31.5) 13(34.5,33.5) 13(35.5,27.5) 13(35.5,29.5) 13(35.5,31.5) 13(35.5,33.5) 13(36.5,27.5) 13(36.5,29.5) 13(36.5,31.5) 13(36.5,33.5) 13(37.5,27.5) 13(37.5,29.5) 13(37.5,31.5) 13(37.5,33.5) 13(38.5,27.5) 13(38.5,29.5) 13(38.5,31.5) 13(38.5,33.5) 13(39.5,27.5) 13(39.5,29.5) 13(39.5,31.5) 13(39.5,33.5) 13(42.5,27.5) 13(42.5,29.5) 13(42.5,31.5) 13(42.5,33.5) 13(43.5,27.5) 13(43.5,29.5) 13(43.5,31.5) 13(43.5,33.5) 13(44.5,27.5) 13(44.5,29.5) 13(44.5,31.5) 13(44.5,33.5) 13(45.5,27.5) 13(45.5,29.5) 13(45.5,31.5) 13(45.5,33.5) 13(46.5,27.5) 13(46.5,29.5) 13(46.5,31.5) 13(46.5,33.5) 13(47.5,27.5) 13(47.5,29.5) 13(47.5,31.5) 13(47.5,33.5) 13(48.5,27.5) 13(48.5,29.5) 13(48.5,31.5) 13(48.5,33.5) 13(49.5,27.5) 13(49.5,29.5) 13(49.5,31.5) 13(49.5,33.5) 13(50.5,27.5) 13(50.5,29.5) 13(50.5,31.5) 13(50.5,33.5) 13(51.5,27.5) 13(51.5,29.5) 13(51.5,31.5) 13(51.5,33.5) 13(131.5,69.5) 13(131.5,70.5) 13(131.5,71.5) 13(131.5,72.5) 13(131.5,73.5) 13(131.5,74.5) 13(131.5,75.5) 13(131.5,76.5) 13(131.5,77.5) 13(131.5,78.5) 13(131.5,81.5) 13(131.5,82.5) 13(131.5,83.5) 13(131.5,84.5) 13(131.5,85.5) 13(131.5,86.5) 13(131.5,87.5) 13(131.5,88.5) 13(131.5,89.5) 13(131.5,90.5) 13(133.5,69.5) 13(133.5,70.5) 13(133.5,71.5) 13(133.5,72.5) 13(133.5,73.5) 13(133.5,74.5) 13(133.5,75.5) 13(133.5,76.5) 13(133.5,77.5) 13(133.5,78.5) 13(133.5,81.5) 13(133.5,82.5) 13(133.5,83.5) 13(133.5,84.5) 13(133.5,85.5) 13(133.5,86.5) 13(133.5,87.5) 13(133.5,88.5) 13(133.5,89.5) 13(133.5,90.5) 13(135.5,69.5) 13(135.5,70.5) 13(135.5,71.5) 13(135.5,72.5) 13(135.5,73.5) 13(135.5,74.5) 13(135.5,75.5) 13(135.5,76.5) 13(135.5,77.5) 13(135.5,78.5) 13(135.5,81.5) 13(135.5,82.5) 13(135.5,83.5) 13(135.5,84.5) 13(135.5,85.5) 13(135.5,86.5) 13(135.5,87.5) 13(135.5,88.5) 13(135.5,89.5) 13(135.5,90.5) 13(137.5,69.5) 13(137.5,70.5) 13(137.5,71.5) 13(137.5,72.5) 13(137.5,73.5) 13(137.5,74.5) 13(137.5,75.5) 13(137.5,76.5) 13(137.5,77.5) 13(137.5,78.5) 13(137.5,81.5) 13(137.5,82.5) 13(137.5,83.5) 13(137.5,84.5) 13(137.5,85.5) 13(137.5,86.5) 13(137.5,87.5) 13(137.5,88.5) 13(137.5,89.5) 13(137.5,90.5)
  round 1.025 hole 1: 14(31.5,25) 14(35,25) 14(38.5,25) 14(43.508,25.001) 14(47.008,25.001) 14(50.508,25.001) 14(140,70.5) 14(140,74) 14(140,77.5) 14(140,82.5) 14(140,86) 14(140,89.5)
  rect 0.25x0.7 smd: ""(62.018,101.936) ""(63.5,101.9) ""(64.118,101.936)
  rect 0.25x0.7 smd rot 45: ""(64.893,102.886)

## Via types
v1: diameter 0.5, hole 0.3, Top Layer to Bottom Layer, 829 vias
v2: diameter 0.5, hole 0.3, Top Layer to Bottom Layer, tented both sides, 255 vias
v3: diameter 0.406, hole 0.305, Top Layer to Bottom Layer, tented both sides, 25 vias
v4: diameter 3, hole 3, Top Layer to Bottom Layer, 4 vias
v5: diameter 1, hole 0.5, Top Layer to Bottom Layer, tented both sides, 3 vias
v6: diameter 0.406, hole 0.3, Top Layer to Bottom Layer, tented both sides, 2 vias

## Nets (pads, with @x,y where several pads share a name; then routed paths per layer and width w, separated by ;. In a path a pad name is that pad's centre, name@x,y a point inside that pad or via, vN(x,y) a via of type N, cw(c..) or ccw(c..) an arc to the next point about the centre after c; other vN are vias at no path point)
3.3V: C21.1 C22.1 C23.1 C24.1 D5.1 D6.1 J1.3 PTC1.2 R3.1 R4.1 S2.2 S3.2 S4.2 U1.2 U3.7 | length 268
  Top Layer w0.254: S2.2@51.9,75.75 S2.2@57.1,75.75 S3.2@59.4,75.75 S3.2@64.6,75.75 S4.2@66.9,75.75 S4.2@72.1,75.75 ; C21.1@128.5,100.3 cw(c128.138,99.938) 128.65,99.938 U3.7@128.65,98.7
  Top Layer w0.305: 44.3,89.5 46,89.5 46.5,90 46.5,95 45.2,96.3 45.2,99.295 ; R4.1@51.218,102.436 51.218,99.418 51.095,99.295 ; S2.2@51.9,75.75 50.25,75.75 49.9,76.1 49.9,85 50.8,85.9 52.637,85.9 ; C22.1@52.6,82.05 52.6,85.863 52.637,85.9 ; D6.1@54.418,104.736 52.704,104.736 52.7,104.732 ; D5.1@54.418,106.436 53.336,106.436 52.7,105.8 52.7,104.732 ; 56.1,88.9 56.1,98.2 55.005,99.295 52.694,99.295 ; C23.1@60.1,82.05 60.1,85.763 60.237,85.9 ; U1.2@62.103,106.39 60.468,108.025 59.371,108.025 58.496,108.9 53.017,108.9 ; C24.1@67.6,82.05 67.6,85.4 67.1,85.9 60.237,85.9 ; C21.1@128.5,100.3 v3(128.5,108.9) ; v3(128.5,112.8) 127.668,113.632 54.632,113.632 53.017,112.017 53.017,108.9 ; 45.2,99.295 51.095,99.295 ; 45.2,99.295 45.2,107.9 46.2,108.9 53.017,108.9 ; 51.095,99.295 52.694,99.295 ; 52.637,85.9 60.237,85.9 ; 52.694,99.295 52.7,99.301 52.7,104.732
  Top Layer w0.6: PTC1.2@43,89.5 44.3,89.5
  Bottom Layer w0.305: v3(128.5,108.9) v3(128.5,112.8)
  Bottom Layer w0.6: J1.3@55,49.08 55.009,49.089 56.438,49.089 56.789,49.44 56.789,86.311 v2(56.6,86.5)
  other v2: 55.5,86.5 55.5,88.9 56.6,88.9
7.5V: C4.1 C5.1 C17.1 D2.2 D10.2 IC1.6 IC2.3 R1.2 Relay1.C2 U2.1 | length 140.8
  Top Layer w0.254: C17.1@63.7,89.5 63.7,90.704 63.8,90.804 U2.1@63.8,91
  Top Layer w0.4: C17.1@63.7,89.5 63.799,89.401 v3(63.8,86.9) ; D10.2@119.3,84.9 122.2,84.9 123.2,85.9 Relay1.C2@123.2,87.54
  Top Layer w0.6: D2.2@31,90.1 C5.1@32.9,90.1 32.95,90.15 34.9,90.15 IC2.3@34.95,90.2 35.45,90.2 35.65,90 35.65,89.5 36.2,88.95 36.2,87.825 R1.2@36.2,86.7 36.2,85.75 36.15,85.7 ; C4.1@34.9,85.4 35.05,85.4 35.35,85.7 36.15,85.7 ; IC1.6@36.55,85.7 36.15,85.7
  Top Layer w0.635: 36.2,87.825 63.756,87.825
  Bottom Layer w0.4: v3(63.8,86.9) 63.8,71.9 66.3,69.4 120.5,69.4 123.2,72.1 Relay1.C2@123.2,87.54
Current_OUT: pad.10@135,86 pad.12@130.5,81.5 pad.12@130.5,82.5 pad.12@130.5,83.5 pad.12@130.5,84.5 pad.12@130.5,85.5 pad.12@130.5,86.5 pad.12@130.5,87.5 pad.12@130.5,88.5 pad.12@130.5,89.5 pad.12@130.5,90.5 pad.12@132.5,81.5 pad.12@132.5,82.5 pad.12@132.5,83.5 pad.12@132.5,84.5 pad.12@132.5,85.5 pad.12@132.5,86.5 pad.12@132.5,87.5 pad.12@132.5,88.5 pad.12@132.5,89.5 pad.12@132.5,90.5 pad.12@134.5,81.5 pad.12@134.5,82.5 pad.12@134.5,83.5 pad.12@134.5,84.5 pad.12@134.5,85.5 pad.12@134.5,86.5 pad.12@134.5,87.5 pad.12@134.5,88.5 pad.12@134.5,89.5 pad.12@134.5,90.5 pad.12@136.5,81.5 pad.12@136.5,82.5 pad.12@136.5,83.5 pad.12@136.5,84.5 pad.12@136.5,85.5 pad.12@136.5,86.5 pad.12@136.5,87.5 pad.12@136.5,88.5 pad.12@136.5,89.5 pad.12@136.5,90.5 pad.12@138.5,81.5 pad.12@138.5,82.5 pad.12@138.5,83.5 pad.12@138.5,84.5 pad.12@138.5,85.5 pad.12@138.5,86.5 pad.12@138.5,87.5 pad.12@138.5,88.5 pad.12@138.5,89.5 pad.12@138.5,90.5 pad.13@131.5,81.5 pad.13@131.5,82.5 pad.13@131.5,83.5 pad.13@131.5,84.5 pad.13@131.5,85.5 pad.13@131.5,86.5 pad.13@131.5,87.5 pad.13@131.5,88.5 pad.13@131.5,89.5 pad.13@131.5,90.5 pad.13@133.5,81.5 pad.13@133.5,82.5 pad.13@133.5,83.5 pad.13@133.5,84.5 pad.13@133.5,85.5 pad.13@133.5,86.5 pad.13@133.5,87.5 pad.13@133.5,88.5 pad.13@133.5,89.5 pad.13@133.5,90.5 pad.13@135.5,81.5 pad.13@135.5,82.5 pad.13@135.5,83.5 pad.13@135.5,84.5 pad.13@135.5,85.5 pad.13@135.5,86.5 pad.13@135.5,87.5 pad.13@135.5,88.5 pad.13@135.5,89.5 pad.13@135.5,90.5 pad.13@137.5,81.5 pad.13@137.5,82.5 pad.13@137.5,83.5 pad.13@137.5,84.5 pad.13@137.5,85.5 pad.13@137.5,86.5 pad.13@137.5,87.5 pad.13@137.5,88.5 pad.13@137.5,89.5 pad.13@137.5,90.5 pad.14@140,82.5 pad.14@140,86 pad.14@140,89.5 U3.2
  other v1: 126,81 127.5,81 129,81 126.75,82.5 128.25,82.5 126,84 127.5,84 129,84 126.75,85.5 128.25,85.5 126,87 127.5,87 129,87 126.75,88.5 128.25,88.5 126,90 127.5,90 129,90 126.75,91.5 128.25,91.5 129.75,91.5 131.25,91.5 132.75,91.5 134.25,91.5 135.75,91.5 137.25,91.5 126,93 127.5,93 129,93 130.5,93 132,93 133.5,93 135,93 136.5,93
DGND: C4.2 C5.2 C6.2 C7.2 C8.2 C9.2 C10.2 C11.2 C12.2 C13.2 C14.2 C17.2 C18.2 C21.2 D3.2 D4.2 IC2.1 J1.4 L4.2 pad.7 pad.8 Q4.2 R2.1 R10.1 R11.2 R13.1 R14.2 R15.2 R17.1 R21.2 R23.1 R24.2 R25.2 R26.2 S1.1 U1.3 U2.9 U3.3 | length 91.5
  Top Layer w0.2: v3(55.6,108.1) 58.628,108.1 59.107,107.62 60.166,107.62 U1.3@61.749,106.036 ; v6(57.2,105.6) 57.418,105.6 57.633,105.815 ; C9.2@58.818,105.136 58.693,105.136 58.229,105.6 57.848,105.6 57.633,105.815 ; C8.2@58.818,106.836 58.693,106.836 58.441,107.089 57.664,107.089 57.418,106.843 57.418,106.029 57.633,105.815 ; R15.2@63.4,96.1 R14.2@64.5,96.1 64.6,96.2 v2(64.6,97.5) ; U2.9@65.6,92.9 66.675,92.9 67.075,93.3 C18.2@67.2,93.3 ; v2(66,96.4) 66.7,96.4 67.2,95.9 R11.2@67.2,95.1 ; C12.2@67.918,104.236 C10.2@67.918,103.436 70.336,103.436 71.7,104.8 v2(71.7,106.6) ; C21.2@127.3,100.3 v2(127.3,110.2) ; U3.3@128.65,95.5 128.65,94.35 128.9,94.1 130.757,94.1 131.3,94.643 131.3,100.1 130.9,100.5 v2(130,100.5)
  Top Layer w0.254: U2.9@64,92.9 64,92.967 64.3,93.267 U2.9@64.3,94
  Top Layer w0.4: R2.1@39.7,86.7 v3(40.9,86.7) ; S1.1@47.768,107.836 S1.1@47.768,103.636 47.768,102.571 48.002,102.336 C7.2@48.718,102.336 48.718,100.32 48.7,100.302 v3(48.7,100.3) ; v3(50.6,84.3) 51.5,83.4 R24.2@51.5,82.05 ; D4.2@54.418,103.036 54.418,101.282 v3(55.2,100.5) ; J1.4@55,51.62 v3(55,56.8) ; C14.2@57.518,109.736 v3(57.518,111.182) ; R25.2@59,82.05 v3(59,85.1) ; v2(59.4,89.5) C17.2@60.9,89.5 ; v3(65.05,82.05) R26.2@66.5,82.05 ; v2(66,101.5) 66.019,101.519 66.619,101.519 66.818,101.718 C11.2@66.818,102.336 ; C13.2@67.718,109.736 70.137,109.736 70.573,109.3 v2(70.6,109.3) ; R17.1@77.2,79.1 77.2,79.8 v2(77.5,80.1) ; R13.1@77.2,92.3 77.2,93.4 77.615,93.815 78.188,93.815 78.773,94.4 v2(78.8,94.4) ; R10.1@77.2,105.6 v2(77.2,106.5) ; v2(105,112.5) 105,112.473 105.2,112.273 R21.2@105.2,110.8 ; v3(116.9,80.5) v3(116.9,80.5) 117.268,80.501 119.45,82.683 Q4.2@119.5,82.683 119.55,82.683 120.25,81.983 120.65,81.983 R23.1@120.7,81.933
  other v1: 27,81 28.5,81 30,81 31.5,81 27.75,82.5 29.25,82.5 30.75,82.5 32.25,82.5 33.75,82.5 27,84 28.5,84 30,84 31.5,84 33,84 27.75,85.5 29.25,85.5 30.75,85.5 32.25,85.5 33.75,85.5 27,87 28.5,87 30,87 31.5,87 33,87 27.75,88.5 29.25,88.5 30.75,88.5 27,90 28.5,90 27.75,91.5 29.25,91.5 27,93 28.5,93 27.75,94.5 29.25,94.5 30.75,94.5 32.25,94.5 36.75,94.5 38.25,94.5 44.25,94.5 27,96 28.5,96 30,96 31.5,96 33,96 34.5,96 36,96 37.5,96 39,96 40.5,96 42,96 43.5,96
  other v2: 76,77 77,77 78,77 79,77 79.5,77.8 80.5,77.8 81.5,77.8 74.7,78 73.7,79 76,79 75.2,79.8 76.5,80 78.4,80.1 79.5,80.5 80.5,80.5 81.5,80.5 74.5,80.6 72.5,81.5 74.1,81.7 72.5,82.5 74.1,82.7 72.5,83.5 74.1,83.7 72.5,84.5 74.1,84.7 72.5,85.5 74.1,85.7 72.5,86.5 74.1,86.7 67,87.4 68,87.4 72.5,87.5 65.7,87.7 69.2,87.7 74.1,87.7 65,88.4 69.9,88.4 72.5,88.5 74.1,88.7 67,89 68,89 70.5,89.1 72.5,89.5 74.1,89.7 69,89.8 71.2,89.8 76,90 77.2,90 78.5,90 79.5,90 71.9,90.5 69.8,90.6 75,90.7 79.5,91 80.5,91 81.5,91 70.6,91.5 72.7,91.9 73.7,91.9 71,92.5 72.7,93 71,93.5 79.5,93.5 80.5,93.5 81.5,93.5 71,94.5 72.7,94.5 71,95.5 78.8,95.5 72.7,96 71,96.5 78.8,96.5 72.7,97 66,97.5 71,97.5 78.8,97.5 72.7,98 64.6,98.5 66,98.5 71,98.5 78.8,98.5 72.7,99 64.6,99.5 66,99.5 71,99.5 78.8,99.5 72.7,100 74,100.3 75,100.3 76,100.3 77,100.3 78,100.3 64.6,100.5 66,100.5 71,100.5 72.7,101 71,101.5 130,101.5 73,102 71.5,102.5 130,102.5 73.6,102.8 72,103.3 76.5,103.5 77.5,103.5 78.5,103.5 79.5,103.5 130,103.5 74.5,103.6 75.5,103.6 72.7,104 79.5,104.4 80.5,104.4 81.5,104.4 130,104.5 73.5,104.8 74.5,105.1 75.5,105.1 130,105.5 70.2,106.1 76,106.5 78.3,106.5 130,106.5 79.5,107 80.5,107 81.5,107 130,107.5 71.7,107.8 69.9,108.2 130,108.5 73.1,109.6 129.8,109.7 71.4,110.2 74.2,110.6 129.3,110.7 126.5,110.9 72.4,111.1 75.3,111.6 125.8,111.7 73.3,112 127.7,112.2 125.1,112.4 77,112.5 78,112.5 79,112.5 80,112.5 81,112.5 82,112.5 83,112.5 84,112.5 85,112.5 86,112.5 87,112.5 88,112.5 89,112.5 90,112.5 91,112.5 92,112.5 93,112.5 94,112.5 95,112.5 96,112.5 97,112.5 98,112.5 99,112.5 100,112.5 101,112.5 102,112.5 103,112.5 104,112.5 106,112.5 107,112.5 108,112.5 109,112.5 110,112.5 111,112.5 112,112.5 113,112.5 114,112.5 115,112.5 116,112.5 117,112.5 118,112.5 119,112.5 120,112.5 121,112.5 122,112.5 123,112.5 124,112.5 74.2,112.9 126.8,112.9 77,114.4 78,114.4 79,114.4 80,114.4 81,114.4 82,114.4 83,114.4 84,114.4 85,114.4 86,114.4 87,114.4 88,114.4 89,114.4 90,114.4 91,114.4 92,114.4 93,114.4 94,114.4 95,114.4 96,114.4 97,114.4 98,114.4 99,114.4 100,114.4 101,114.4 102,114.4 103,114.4 104,114.4 105,114.4 106,114.4 107,114.4 108,114.4 109,114.4 110,114.4 111,114.4 112,114.4 113,114.4 114,114.4 115,114.4 116,114.4 117,114.4 118,114.4 119,114.4 120,114.4 121,114.4 122,114.4 123,114.4 124,114.4
HS: C16.2 D7.2 D8.2 D9.2 L1.1 L2.1 L3.1 Q1.2 Q2.2 Q3.2 U2.5 | length 31.4
  Top Layer w0.2: C16.2@66,89.8 66,90.55 65.8,90.75 U2.5@65.8,91 68.244,91 68.544,91.3 v6(68.6,91.3)
  Bottom Layer w0.2: v6(68.6,91.3) 70.02,91.3 70.323,90.998 71.687,90.998 72.038,91.349 74.449,91.349 74.717,91.617 75.709,91.617 76.502,90.824 76.502,88.198 77.5,87.2 77.5,81.8 77.917,81.383 81.732,81.383 81.852,81.502 85.748,81.502 v1(86.25,81)
  other v1: 85.5,73.5 87,73.5 88.5,73.5 90,73.5 87.75,81 89.25,81 90.75,81 92.25,81 93.75,81 86.25,84 87.75,84 89.25,84 90.75,84 92.25,84 93.75,84 85.5,85.5 87,85.5 88.5,85.5 90,85.5 91.5,85.5 93,85.5 85.5,94.5 87,94.5 88.5,94.5 90,94.5 91.5,94.5 93,94.5 86.25,96 87.75,96 89.25,96 93.75,96 85.5,97.5 87,97.5 88.5,97.5 90,97.5 91.5,97.5 93,97.5 86.25,99 87.75,99 89.25,99 90.75,99 92.25,99 93.75,99 85.5,106.5 87,106.5 88.5,106.5 90,106.5 86.25,108 87.75,108 89.25,108 90.75,108 93.75,108 85.5,109.5 87,109.5 88.5,109.5 90,109.5 93,109.5
NetC6_1: C6.1 IC2.2 PTC1.1 | length 9.5
  Top Layer w0.6: IC2.2@34.95,92.5 IC2.2@41,92.5 41.2,92.3 C6.1@43,92.3 PTC1.1@43,90.9
NetC7_1: C7.1 R4.2 S1.2 U1.4 | length 19.2
  Top Layer w0.254: C7.1@49.918,102.336 S1.2@49.918,103.636 ; S1.2@49.918,107.836 49.918,107.241 ; R4.2@51.218,103.636 S1.2@49.918,103.636 ; U1.4@61.396,105.683 60.553,106.526 60.02,106.526 59.305,107.241 58.95,107.241 58.591,107.6 56.509,107.6 56.15,107.241 49.918,107.241 ; S1.2@49.918,103.636 49.918,107.241
NetC10_1: C10.1 pad.@65.818,103.736 R20.2 R21.1 U1.14 | length 47.3
  Top Layer w0.254: U1.14@64.083,104.41 64.757,103.736 pad.@65.818,103.736 66.549,103.736 66.779,103.506 C10.1@67.116,103.506 ; C10.1@67.118,103.436 67.118,103.309 ccw(c67.572,103.309) 67.251,102.989 ; 67.251,102.989 67.384,102.856 ccw(c68.001,103.473) 68.001,102.6 69.633,102.6 ; 69.634,102.6 ccw(c69.634,103.967) 70.6,103 73.775,106.175 ccw(c72.751,107.2) 74.2,107.198 74.2,108.802 cw(c75.89,108.8) 74.695,109.995 76.075,111.375 cw(c77.1,110.351) 77.1,111.8 102.902,111.8 cw(c102.902,111.202) 103.5,111.202 103.5,110.8 ; R20.2@103,110.8 103.5,110.8 ; R21.1@104,110.8 103.5,110.8
NetC11_1: C11.1 pad.@64.893,102.886 U1.13 U2.7 | length 11.2
  Top Layer w0.152: pad.@64.893,102.886 65.3,102.479 ; U2.7@65.3,94 65.3,102.479 ; C11.1@66.018,102.336 65.443,102.336 65.3,102.479
  Top Layer w0.254: U1.13@63.921,103.862 63.976,103.807 63.976,103.804 pad.@64.893,102.886
NetC12_1: C12.1 pad.11 U1.15 U3.6 | length 83.1
  Top Layer w0.254: U1.15@64.507,104.693 64.735,104.465 ; 64.736,104.464 ccw(c65.133,104.862) 65.133,104.3 pad.11@65.8,104.3 66.965,104.3 cw(c66.965,104.083) C12.1@67.118,104.236 cw(c67.647,104.236) 67.137,104.376 cw(c67.647,104.236) 67.647,104.766 68.207,104.766 68.209,104.766 cw(c68.209,103.975) 68.734,104.566 68.804,104.496 ccw(c69.283,104.983) 69.283,104.3 ; 69.284,104.3 69.839,104.3 ccw(c69.839,105.77) 70.576,104.498 70.583,104.506 ccw(c69.819,105.27) 70.9,105.27 70.9,107.791 ; 70.9,107.792 cw(c72.608,107.792) 71.4,109 75.202,112.802 cw(c76.163,111.841) 76.163,113.2 124.763,113.2 cw(c124.763,111.422) 126.02,112.68 ; 126.021,112.679 128.699,110.001 cw(c127.611,108.913) 129.15,108.913 U3.6@129.15,98.7
NetC13_1: C13.1 R8.1 U1.20 X1.1 | length 9.7
  Top Layer w0.254: U1.20@63.093,106.814 63.093,108.911 cw(c63.918,108.911) 63.918,109.736 X1.1@64.818,109.736 ; R8.1@63.218,112.236 63.918,112.236 cw(c63.918,111.336) 64.818,111.336 X1.1@64.818,109.736 ; C13.1@66.518,109.736 X1.1@64.818,109.736
NetC14_1: C14.1 R8.2 U1.1 X1.2 | length 9.9
  Top Layer w0.254: C14.1@58.718,109.736 X1.2@60.418,109.736 ; R8.2@62.018,112.236 61.318,112.236 ccw(c61.318,111.336) 60.418,111.336 X1.2@60.418,109.736 ; U1.1@62.386,106.814 62.386,108.869 ccw(c61.518,108.869) 61.518,109.736 X1.2@60.418,109.736
NetC15_ANOT: C15.ANOT C19.ANOT C20.ANOT L1.2 L2.2 L3.2 R18.1 Relay1.COM | length 8.2
  Top Layer w0.254: R18.1@99.6,110.8 99.6,104.7 L1.2@101.1,103.2
  other v1: 105,73.5 106.5,73.5 108,73.5 109.5,73.5 111,73.5 104.25,75 105.75,75 110.25,75 111.75,75 105,76.5 104.25,78 105,79.5 101.25,81 102.75,81 104.25,81 101.25,84 102.75,84 104.25,84 100.5,85.5 102,85.5 103.5,85.5 105,85.5 104.25,87 105.75,87 107.25,87 108.75,87 110.25,87 111.75,87 105,88.5 106.5,88.5 109.5,88.5 111,88.5 104.25,90 105,91.5 104.25,93 100.5,94.5 102,94.5 103.5,94.5 105,94.5 101.25,96 102.75,96 104.25,96 100.5,97.5 102,97.5 103.5,97.5 105,97.5 101.25,99 102.75,99 104.25,99 105,100.5 106.5,100.5 109.5,100.5 111,100.5 112.5,100.5 114,100.5 115.5,100.5 104.25,102 105.75,102 110.25,102 111.75,102 113.25,102 105,103.5 114,103.5 104.25,105 105,106.5
NetC16_1: C16.1 U2.3 | length 1.2
  Top Layer w0.152: C16.1@64.7,89.8 64.8,89.9 U2.3@64.8,91
NetC18_1: C18.1 pad.@59.8,103.7 R5.2 R11.1 U1.7 U2.6 | length 24.5
  Top Layer w0.152: U2.6@65.8,94 U2.6@65.8,94.076 ; R11.1@66,95.1 66,94.95 65.8,94.75 U2.6@65.8,94.076 ; C18.1@67.2,94.1 65.824,94.1 U2.6@65.8,94.076
  Top Layer w0.254: v3(60.9,97.289) 60.9,97.3 58.018,100.182 R5.2@58.018,103.036 58.018,103.186 58.532,103.7 pad.@59.8,103.7 60.686,103.7 U1.7@61.396,104.41 ; C18.1@67.2,94.1 68.4,94.1 68.795,94.495 68.795,94.705 68.409,95.091 68.109,95.091 v3(68.1,95.1)
  Bottom Layer w0.254: v3(60.9,97.289) 60.911,97.289 63.1,95.1 v3(68.1,95.1)
NetC22_2: C22.2 pad.@63.5,101.9 R24.1 S2.1 U1.11 | length 37
  Top Layer w0.254: C22.2@52.6,80.85 R24.1@51.5,80.85 51.5,79.673 51.723,79.45 S2.1@51.9,79.45 S2.1@57.1,79.45 57.55,79.45 57.773,79.673 57.773,85.173 v3(57.8,85.2) ; v3(62.7,99.7) 63.394,100.394 63.394,100.977 63.5,101.084 pad.@63.5,101.9 63.5,102.872 U1.11@63.093,103.279
  Bottom Layer w0.254: v3(57.8,85.2) 57.8,98.5 59,99.7 v3(62.7,99.7)
NetC23_2: C23.2 pad.@64.118,101.936 R25.1 S3.1 U1.12 | length 36.6
  Top Layer w0.254: C23.2@60.1,80.85 R25.1@59,80.85 59,79.673 59.223,79.45 S3.1@59.4,79.45 61.462,79.45 ; v3(61.462,85.162) 61.462,79.45 ; v3(62.5,98.4) 63.2,98.4 63.8,99 63.8,100.809 64.118,101.127 pad.@64.118,101.936 64.118,102.961 U1.12@63.376,103.703 ; S3.1@64.6,79.45 61.462,79.45
  Bottom Layer w0.254: v3(61.462,85.162) 61.462,90.829 59.6,92.692 59.6,97.3 60.7,98.4 v3(62.5,98.4)
NetC24_2: C24.2 pad.@66.318,105.636 R26.1 S4.1 U1.16 | length 48.2
  Top Layer w0.254: v3(62.5,85.1) 62.5,81.6 63.25,80.85 R26.1@66.5,80.85 ; U1.16@64.507,105.4 64.744,105.636 pad.@66.318,105.636 68.864,105.636 v3(69.3,105.2) ; C24.2@67.6,80.85 R26.1@66.5,80.85 ; S4.1@72.1,79.45 S4.1@66.9,79.45 66.723,79.45 66.5,79.673 R26.1@66.5,80.85
  Bottom Layer w0.254: v3(62.5,85.1) 62.5,90.366 60.006,92.86 60.006,97.132 60.646,97.771 63.271,97.771 64.071,98.571 64.071,100.719 67.651,104.3 69.1,104.3 69.3,104.5 v3(69.3,105.2)